# Altium PCB PCB.PcbDoc
Units mil, origin at the board's own origin, x right, y up, seen from the top; angles counter-clockwise.
Board outline 920 x 875 mil, 6 copper layers (Top Layer, Mid Layer 1, Mid Layer 2, Mid Layer 3, Mid Layer 4, Bottom Layer), stack 47.126 mil thick; 39 components, 39 nets, 267 pads, 117 vias.
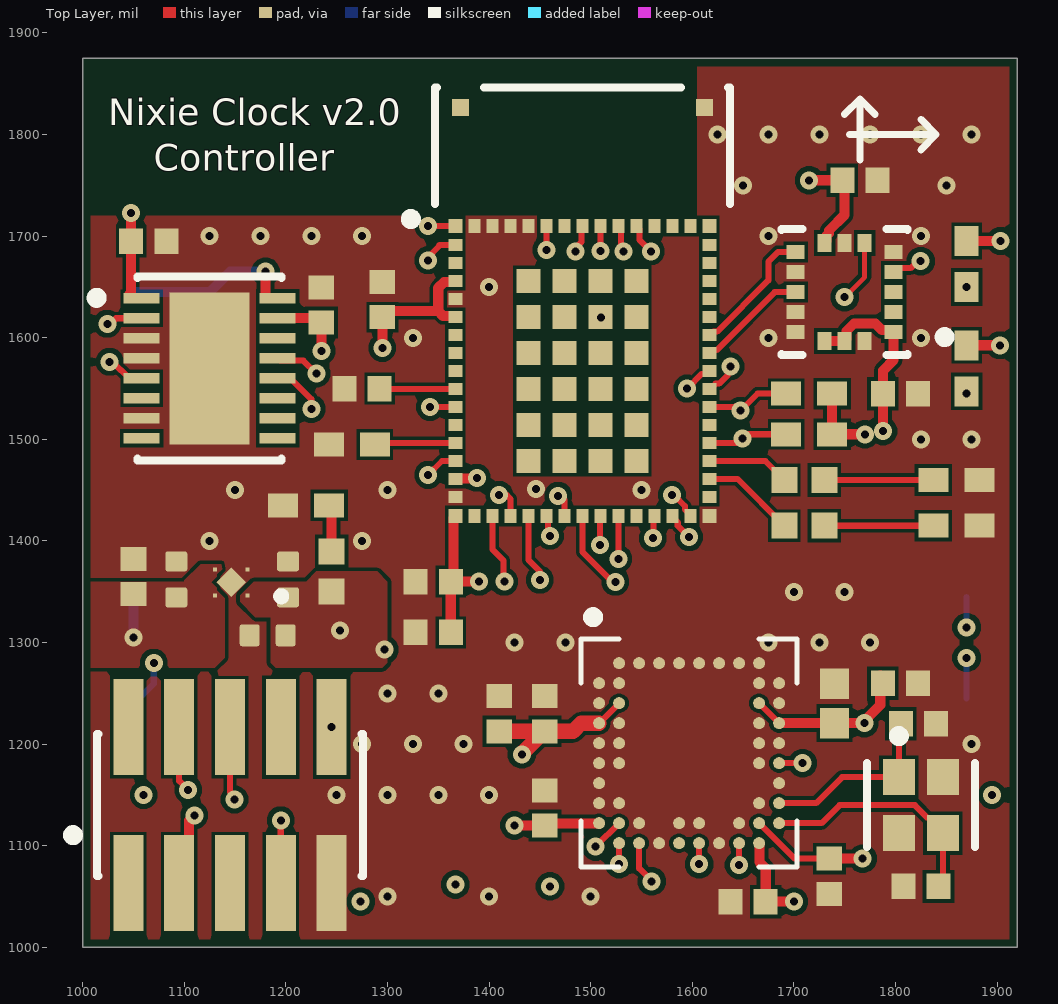
[diagram p0: Top Layer view]
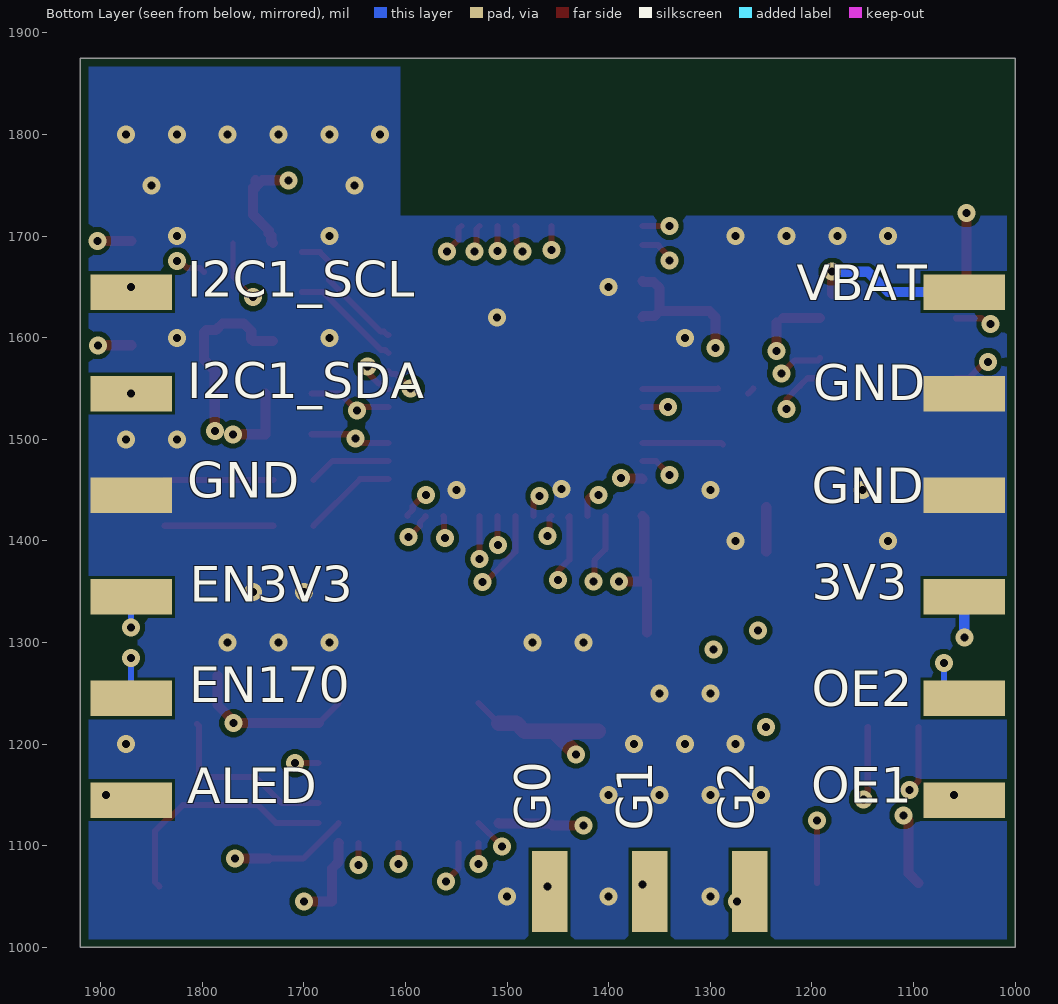
[diagram p1: Bottom Layer view, seen from below]
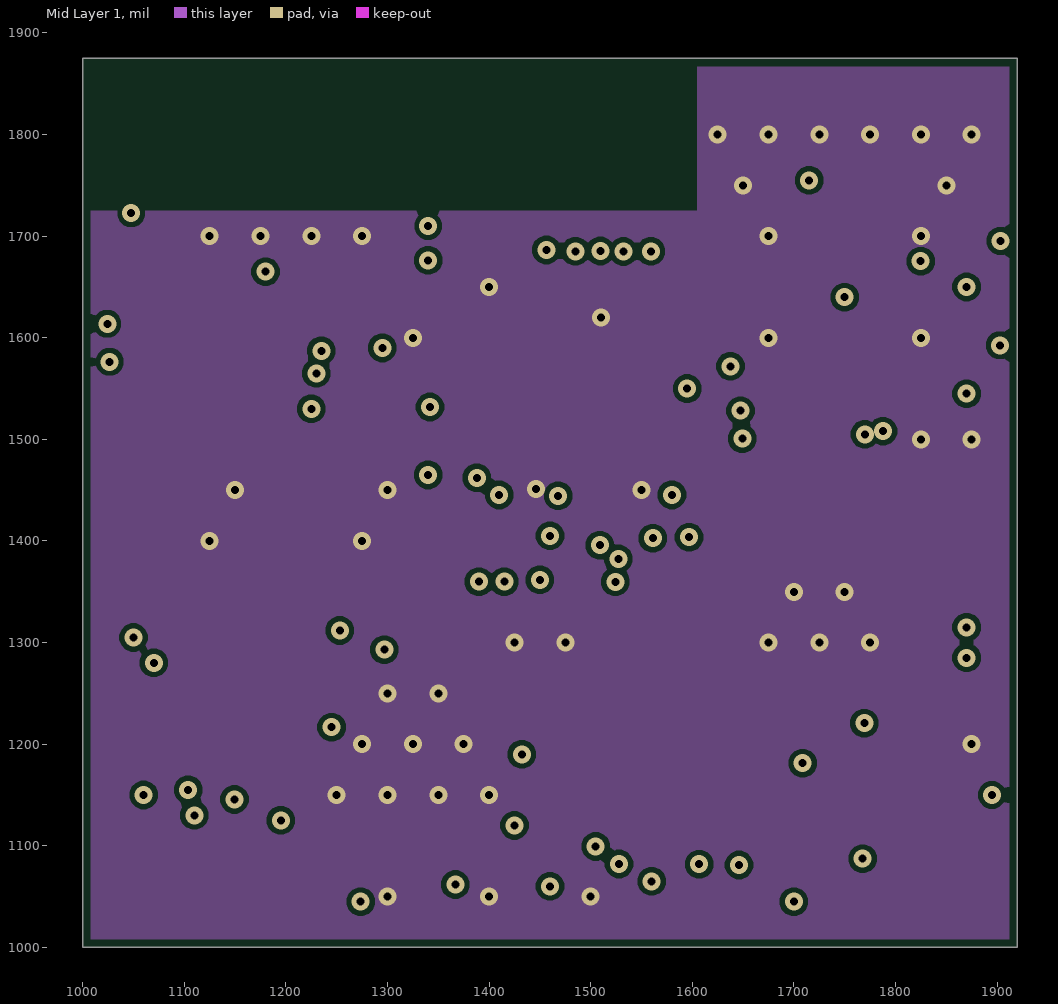
[diagram p2: Mid Layer 1]
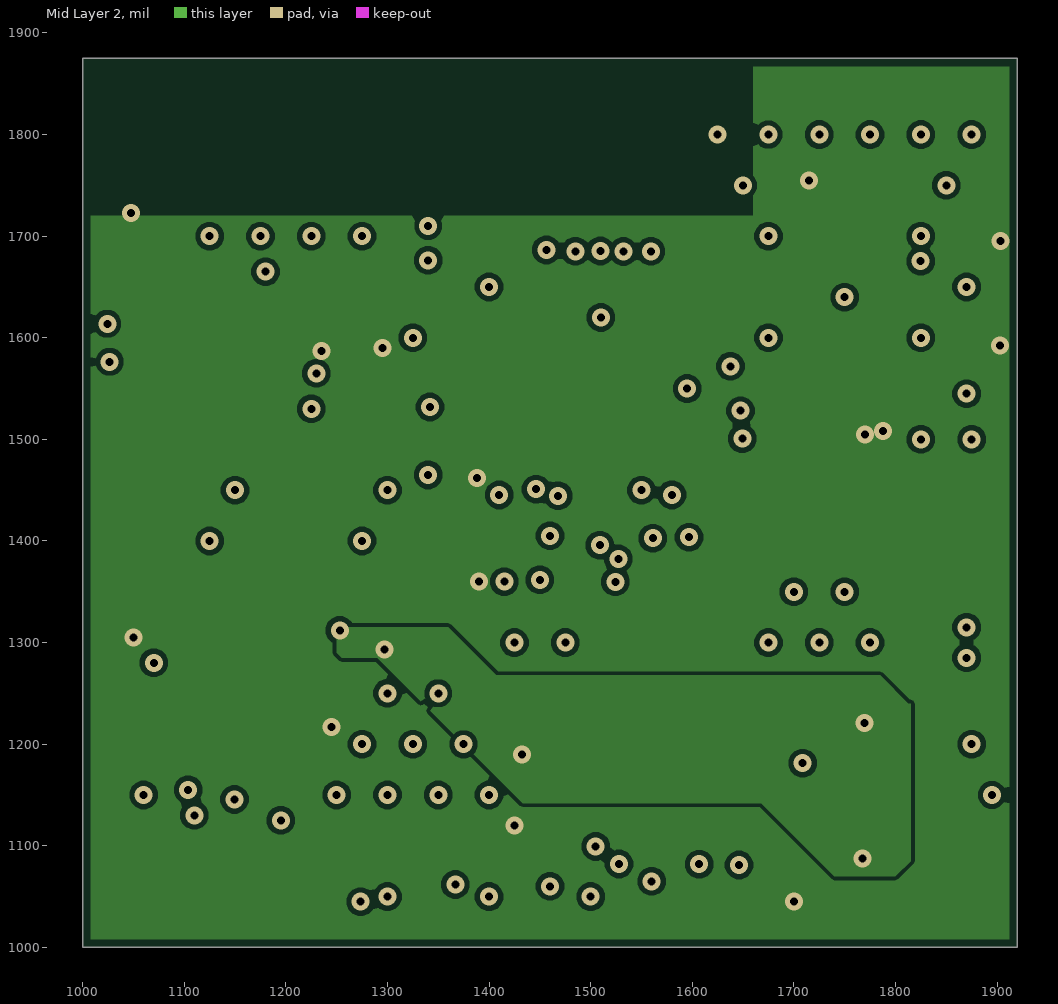
[diagram p3: Mid Layer 2]
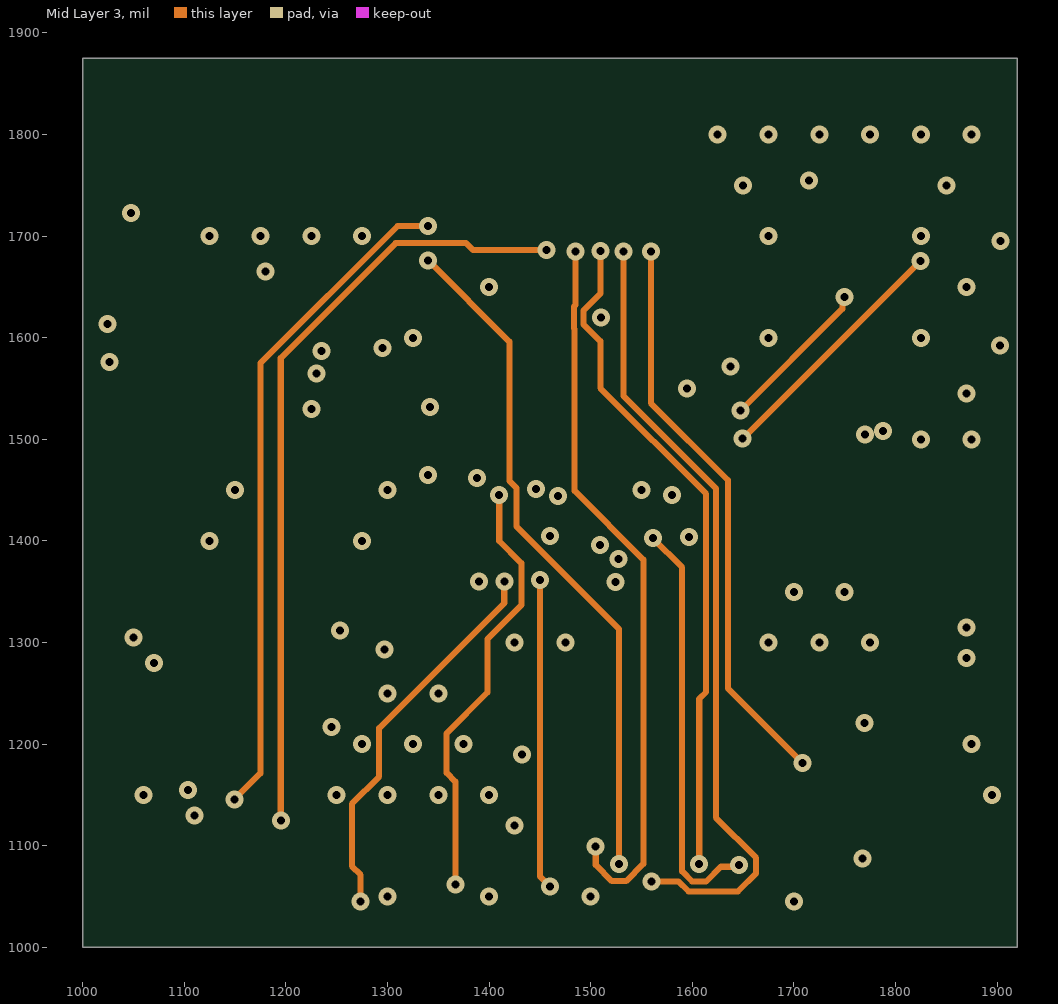
[diagram p4: Mid Layer 3]
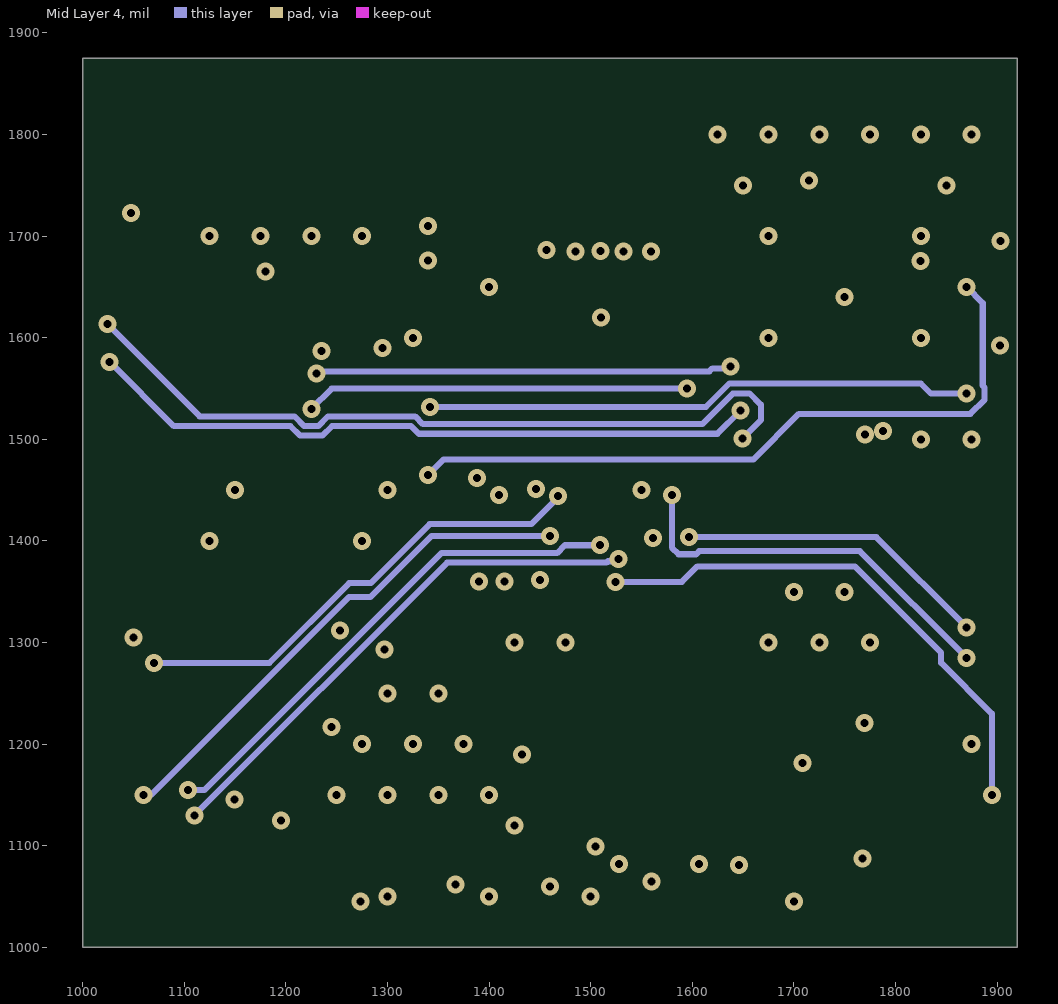
[diagram p5: Mid Layer 4]

## Layer stack, top to bottom
Top Solder: solder mask 0.5, Solder Resist, Dk 3.8
Top Layer: signal copper 1.378
Dielectric 1: prepreg 3.937, 2313, Dk 4.05
Mid Layer 1: signal copper 0.689
Core 1: core 14.3701, FR-4, Dk 4.5
Mid Layer 2: signal copper 0.689
Dielectric 2: prepreg 5, 2116, Dk 4.25
Mid Layer 3: signal copper 0.689
Core 2: core 14.3701, FR-4, Dk 4.5
Mid Layer 4: signal copper 0.689
Dielectric 3: prepreg 3.937, 2313, Dk 4.05
Bottom Layer: signal copper 1.378
Bottom Solder: solder mask 0.5, Solder Resist, Dk 3.8

## Board outline
1000,1000 1920,1000 1920,1875 1000,1875

## Design rules (kind name [scope] priority, off if disabled: settings)
BoardOutlineClearance [All] p1: gap=7.87 ignorepadtopadclearanceinfootprint=FALSE
Clearance [All] p1: gap=3.5 ignorepadtopadclearanceinfootprint=FALSE except(5: Arc-Via Track-Via SMDPad-Via THPad-Via Via-Via Via-Fill Via-Poly Via-Region Via-Text; 9.84: Arc-Hole Track-Hole SMDPad-Hole THPad-Hole Via-Hole Fill-Hole Poly-Hole Region-Hole Text-Hole)
ComponentClearance [All] p1: gap=3.5 collisioncheckmode=3 verticalgap=3.5 showdistances=TRUE
DiffPairsRouting [All] p1: maxlimit=3.5 minlimit=3.5 mostfreqgap=3.5 toplayer_minwidth=3.5 toplayer_maxwidth=71497.94 toplayer_prefwidth=3.5 midlayer1_minwidth=3.5 midlayer1_maxwidth=71497.94 midlayer1_prefwidth=3.5 midlayer2_minwidth=3.5 midlayer2_maxwidth=71497.94 midlayer2_prefwidth=3.5 midlayer3_minwidth=3.5 midlayer3_maxwidth=71497.94 midlayer3_prefwidth=3.5 midlayer4_minwidth=3.5 midlayer4_maxwidth=71497.94 midlayer4_prefwidth=3.5 bottomlayer_minwidth=3.5 bottomlayer_maxwidth=71497.94 bottomlayer_prefwidth=3.5 maxuncoupledlength=500
Height [All] p1: minheight=0 maxheight=71497.94 prefheight=500
HoleSize [All] p1: absolutevalues=TRUE maxlimit=248.03 minlimit=7.87 maxpercent=80.000 minpercent=20.000
HoleToHoleClearance [All] p1: gap=9.84 allowstackedmicrovias=FALSE
MinimumAnnularRing [All] p1: minimumring=3
MinimumSolderMaskSliver [All] p1: minsoldermaskwidth=0
PlaneClearance [All] p1: clearance=3.5
PlaneConnect PlaneConnectPowerPads [InPadClass('PowerPads')] p1: planeconnectstyle=Direct reliefexpansion=20 reliefentries=4 reliefconductorwidth=10 reliefairgap=10
PlaneConnect [All] p2: planeconnectstyle=Direct reliefexpansion=11.81 reliefentries=4 reliefconductorwidth=3.5 reliefairgap=3.5
PolygonConnect PolygonConnectPowerPads [All vs (InPadClass('PowerPads'))] p1: connectstyle=Direct reliefconductorwidth=10 reliefentries=4 polygonreliefangle="90 Angle" airgapwidth=10
PolygonConnect [All] p2: connectstyle=Direct reliefconductorwidth=3.5 reliefentries=4 polygonreliefangle="90 Angle" airgapwidth=3.5
RoutingVias [All] p1: holewidth=7.87 width=17.72 viastyle="Through Hole" minholewidth=7.87 minwidth=17.72 maxholewidth=248.03 maxwidth=257.87
SilkToSilkClearance [All] p1: silktosilkclearance=0
SilkToSolderMaskClearance [IsPad] p1: minsilkscreentomaskgap=3.5 clearancetoexposedcopper=TRUE
SolderMaskExpansion SolderMaskExpansion_Via [IsVia] p1: expansion=2.95 istentingtop=TRUE
SolderMaskExpansion [All] p2: expansion=2.95 istentingtop=FALSE
Width [All] p1: maxlimit=71497.94 minlimit=3.5 preferedwidth=3.5
20 further rules are at their usual default settings.

## Classes and differential pairs
component class Peripherals: C21 U4
component class Radar: C10 U1 U2 Y1
component class Processor: D2 MD1 R3 R8

## Components (designator, comment, footprint, x,y, rotation, side; value= is the part's Value field where it differs from the comment)
C1 "" "CAP 0402_1005" 1275,1550 r180 top value="0.1 µF"
C2 "" "CAP 0402_1005" 1050,1365 r270 top value="0.1 µF"
C3 "" "CAP 0402_1005" 1345,1310 r0 top value="1 µF"
C4 "" "CAP 0402_1005" 1295,1637.68 r270 top value="0.1 µF"
C5 "" "CAP 0402_1005" 1345,1360 r0 top value="1 µF"
C6 "" "CAP 0402_1005" 1455,1137.32 r270 top value="0.1 µF"
C7 "" "CAP 0402_1005" 1825,1060 r0 top value="9 pF"
C8 "" "CAP 0402_1005" 1822.68,1220 r180 top value="9 pF"
C9 "" "CAP 0402_1005" 1805,1260 r180 top value="0.1 µF"
C10 "" "CAP 0402_1005" 1410,1230 r270 top value="0.1 µF"
C11 "" "CAP 0402_1005" 1735,1070 r90 top value="0.1 µF"
C12 "" "CAP 0402_1005" 1455,1230 r270 top value="1 µF"
C13 "" "CAP 0402_1005" 1805,1545 r180 top value="0.1 µF"
C14 "" "CAP 0402_1005" 1235,1632.32 r270 top value="1 µF"
C15 "" CAPC1050X55X23ML05T13 1740,1240 r270 top
C16 "" "CAP 0402_1005" 1655,1045 r0 top value="1 µF"
C17 "" CAPC0402(1005)60_L 1182.17,1307.17 r0 top value=10u
C18 "" CAPC0402(1005)60_L 1202.17,1362.17 r270 top value=100n
C19 "" CAPC0402(1005)60_L 1092.17,1362.17 r270 top value=10u
C20 "" "CAP 0402_1005" 1765,1755 r180 top value="0.1 µF"
C21 "" "CAP 0402_1005" 1065,1695 r180 top value="1 µF"
D1 "" "LED 0402_1005 YELLOW" 1860,1415 r0 top value=Red
D2 "" "LED 0402_1005 YELLOW" 1860,1460 r0 top value=Red
D3 "" "LED 0402_1005 YELLOW" 1220,1435 r180 top value=Red
J1 "" FP-62131021021-MFG 1145,1140 r0 top
MD1 "" FP-STM32WB5MMGH6TR-MFG 1491.85,1628.31 r0 top
R1 "" "RES 0402_1005" 1265,1495 r0 top value="10 kOhms"
R2 "" RESC1005X40X25ML05T05 1710.32,1415 r180 top value=1.5k
R3 "" RESC1005X40X25ML05T05 1710.32,1460 r180 top value=1.5k
R4 "" RESC1005X40X25ML05T05 1245,1370 r270 top value=1.5k
R5 "" "RES 0402_1005" 1870,1672.64 r270 top value="10 kOhms"
R6 "" "RES 0402_1005" 1870,1570 r270 top value="10 kOhms"
R7 "" "RES 0402_1005" 1715,1505 r180 top value="10 kOhms"
R8 "" "RES 0402_1005" 1715,1545 r180 top value="10 kOhms"
U1 "" BGA50C50P10X10_520X550X90 1596.85,1191.18 r0 top
U2 "" VREG_NCP170AMX180TBG 1146.22,1359.37 r180 top
U4 "" FP-SOT1992-1_DD-MFG 1125,1570 r0 top
U5 "" FP-TFLGA16-7983231-MFG 1750,1645 r180 top
Y1 "" FP-CX2016DB48000C0WPLA2-MFG 1825,1140 r270 top

## Footprints (in the part's own frame and the unit in brackets; to place one, negate y for a bottom-side part, rotate by r counter-clockwise, add the part's x,y. Pads: shape width x height; smd on the part's side, far side on the other; paste and mask are expansions set on the pad)
BGA50C50P10X10_520X550X90 [mm]
  round 0.3 smd mask+0.05: A2(-1.75,2.25) A3(-1.25,2.25) A4(-0.75,2.25) A5(-0.25,2.25) A6(0.25,2.25) A7(0.75,2.25) A8(1.25,2.25) A9(1.75,2.25) B1(-2.25,1.75) B2(-1.75,1.75) B9(1.75,1.75) B10(2.25,1.75) C1(-2.25,1.25) C2(-1.75,1.25) C9(1.75,1.25) C10(2.25,1.25) D1(-2.25,0.75) D2(-1.75,0.75) D9(1.75,0.75) D10(2.25,0.75) E1(-2.25,0.25) E2(-1.75,0.25) E9(1.75,0.25) E10(2.25,0.25) F1(-2.25,-0.25) F2(-1.75,-0.25) F9(1.75,-0.25) F10(2.25,-0.25) G1(-2.25,-0.75) G10(2.25,-0.75) H1(-2.25,-1.25) H2(-1.75,-1.25) H9(1.75,-1.25) H10(2.25,-1.25) J1(-2.25,-1.75) J2(-1.75,-1.75) J3(-1.25,-1.75) J5(-0.25,-1.75) J6(0.25,-1.75) J8(1.25,-1.75) J9(1.75,-1.75) J10(2.25,-1.75) K2(-1.75,-2.25) K3(-1.25,-2.25) K4(-0.75,-2.25) K5(-0.25,-2.25) K6(0.25,-2.25) K7(0.75,-2.25) K8(1.25,-2.25) K9(1.75,-2.25)
  silkscreen extent -2.7,-2.85 2.7,3.52, body extent -2.6,-3 2.6,2.5, height 0.51
"CAP 0402_1005" [mm] "Chip Capacitor, 2-Leads, Body 1.02x0.51mm, IPC Medium Density"
  rect 0.6x0.64 smd: 1(-0.44,0) 2(0.44,0)
  body extent -0.5,-0.26 0.5,0.26, height 0.52
CAPC0402(1005)60_L [mm] "Chip Capacitor, Body 1.0x0.5mm, Height 0.6mm, IPC High Density"
  rrect25% 0.5x0.55 smd: 1(-0.45,0) 2(0.45,0)
  body extent -0.5,-0.25 0.5,0.25, height 0.6
CAPC1050X55X23ML05T13 [mm] "Chip Capacitor, 2-Leads, Body 1.05x0.55mm, IPC Low Density"
  rect 0.76x0.72 smd: 1(-0.49,0) 2(0.49,0)
  body extent -0.53,-0.28 0.53,0.27, height 0.55
FP-62131021021-MFG [mm]
  rect 0.75x2.4 smd paste+0 mask+0: 1(-2.54,-1.95) 2(-2.54,1.95) 3(-1.27,-1.95) 4(-1.27,1.95) 5(0,-1.95) 6(0,1.95) 7(1.27,-1.95) 8(1.27,1.95) 9(2.54,-1.95) 10(2.54,1.95)
  silkscreen extent -4.05,-1.78 3.32,1.78, body extent -3.42,-3.25 3.42,3.25, height 0.25
FP-CX2016DB48000C0WPLA2-MFG [mm]
  rect 0.9x0.8 smd paste+0 mask+0: 1(-0.7,-0.55) 2(0.7,-0.55) 3(0.7,0.55) 4(-0.7,0.55)
  silkscreen extent -1.85,-1.35 1.05,1.35, body extent -1.25,-1.05 1.25,1.05, height 0.25
FP-SOT1992-1_DD-MFG [mm]
  rect 0.9x0.27 smd paste+0 mask+0: 1(-1.7,1.75) 2(-1.7,1.25) 3(-1.7,0.75) 4(-1.7,0.25) 5(-1.7,-0.25) 6(-1.7,-0.75) 7(-1.7,-1.25) 8(-1.7,-1.75) 9(1.7,-1.75) 10(1.7,-1.25) 11(1.7,-0.75) 12(1.7,-0.25) 13(1.7,0.25) 14(1.7,0.75) 15(1.7,1.25) 16(1.7,1.75)
  rect 2x3.8 smd paste-1000 mask+0: 17(0,0)
  silkscreen extent -2.95,-2.3 1.8,2.3, body extent -2.25,-2.4 2.25,2.4, height 0.25
FP-STM32WB5MMGH6TR-MFG [mm]
  rect 0.35x0.35 smd paste+0 mask+0: 1(-3.175,2.075) 17(-3.175,-5.175) 31(3.175,-5.175) 47(3.175,2.075)
  rect 0.35x0.3 smd paste+0 mask+0: 2(-3.175,1.6) 3(-3.175,1.15) 4(-3.175,0.7) 5(-3.175,0.25) 6(-3.175,-0.2) 7(-3.175,-0.65) 8(-3.175,-1.1) 9(-3.175,-1.55) 10(-3.175,-2) 11(-3.175,-2.45) 12(-3.175,-2.9) 13(-3.175,-3.35) 14(-3.175,-3.8) 15(-3.175,-4.25) 16(-3.175,-4.7) 32(3.175,-4.7) 33(3.175,-4.25) 34(3.175,-3.8) 35(3.175,-3.35) 36(3.175,-2.9) 37(3.175,-2.45) 38(3.175,-2) 39(3.175,-1.55) 40(3.175,-1.1) 41(3.175,-0.65) 42(3.175,-0.2) 43(3.175,0.25) 44(3.175,0.7) 45(3.175,1.15) 46(3.175,1.6)
  rect 0.3x0.35 smd paste+0 mask+0: 18(-2.7,-5.175) 19(-2.25,-5.175) 20(-1.8,-5.175) 21(-1.35,-5.175) 22(-0.9,-5.175) 23(-0.45,-5.175) 24(0,-5.175) 25(0.45,-5.175) 26(0.9,-5.175) 27(1.35,-5.175) 28(1.8,-5.175) 29(2.25,-5.175) 30(2.7,-5.175) 48(2.7,2.075) 49(2.25,2.075) 50(1.8,2.075) 51(1.35,2.075) 52(0.9,2.075) 53(0.45,2.075) 54(0,2.075) 55(-0.45,2.075) 56(-0.9,2.075) 57(-1.35,2.075) 58(-1.8,2.075) 59(-2.25,2.075) 60(-2.7,2.075)
  rect 0.6x0.6 smd paste+0 mask+0: 61(-1.35,0.7) 62(-1.35,-0.2) 63(-1.35,-1.1) 64(-1.35,-2) 65(-1.35,-2.9) 66(-1.35,-3.8) 67(-0.45,-3.8) 68(0.45,-3.8) 69(1.35,-3.8) 70(1.35,-2.9) 71(1.35,-2) 72(1.35,-1.1) 73(1.35,-0.2) 74(1.35,0.7) 75(0.45,0.7) 76(-0.45,0.7) 77(-0.45,-0.2) 78(-0.45,-1.1) 79(-0.45,-2) 80(-0.45,-2.9) 81(0.45,-2.9) 82(0.45,-2) 83(0.45,-1.1) 84(0.45,-0.2)
  rect 0.43x0.43 smd paste+0 mask+0: 85(-3.05,5.035) 86(3.05,5.035)
  silkscreen extent -4.41,2.13 3.69,5.54, body extent -4.19,-6.04 4.19,6.04, height 0.25
FP-TFLGA16-7983231-MFG [mm]
  rect 0.45x0.35 smd paste+0 mask+0: 1(-1.225,1) 2(-1.225,0.5) 3(-1.225,0) 4(-1.225,-0.5) 5(-1.225,-1) 9(1.225,-1) 10(1.225,-0.5) 11(1.225,0) 12(1.225,0.5) 13(1.225,1)
  rect 0.35x0.45 smd paste+0 mask+0: 6(-0.5,-1.225) 7(0,-1.225) 8(0.5,-1.225) 14(0.5,1.225) 15(0,1.225) 16(-0.5,1.225)
  silkscreen extent -2.63,-1.58 1.58,1.58, body extent -2.07,-2.07 2.07,2.07, height 0.25
"LED 0402_1005 YELLOW" [mm] "Chip Diode, 2-Leads, Body 1.00x0.50mm, IPC Medium Density"
  rect 0.75x0.6 smd: 1(-0.575,0) 2(0.575,0)
  body extent -0.5,-0.25 0.5,0.25, height 0.21
"RES 0402_1005" [mm] "Chip Resistor, 2-Leads, Body 1.0x0.5mm, IPC Medium Density"
  rect 0.75x0.6 smd: 1(-0.575,0) 2(0.575,0)
  body extent -0.5,-0.25 0.5,0.25, height 0.35
RESC1005X40X25ML05T05 [mm] "Chip Resistor, 2-Leads, Body 1.05x0.55mm, IPC Low Density"
  rect 0.65x0.65 smd: 1(-0.5,0) 2(0.5,0)
  body extent -0.53,-0.28 0.53,0.28, height 0.4
VREG_NCP170AMX180TBG [mm]
  rect 0.1x0.1 smd paste-1 mask+0: 1(-0.405,0.325) 2(-0.405,-0.325) 3(0.405,-0.325) 4(0.405,0.325)
  rect 0.52x0.52 smd rot 45: 5(0,0)
  silkscreen extent -1.35,0.25 -1.15,0.45

## Part data
C1 C2 C4 C6 C9 C10 C11 C13 C20: library part C0402C104K7PAC7867, "CAP CER 0.1UF 4V X5R 0402", Capacitance="0.1 µF", Device Package="0402 (1005 Metric)", Manufacturer=KEMET, Operating Temperature="-55°C ~ 85°C", Supplier Part Number 1=399-14871-1-ND, Temperature Coefficient=X5R, Tolerance=±10%, Voltage - Rated=4V, Applications="Bypass, Decoupling", componentlink1description=Datasheet, componentlink1url=https://api.kemet.com/component-edge/download/datasheet/C0402C104K7PAC7867.pdf, ComponentLink2Description="DigiKey Link", ComponentLink2URL=https://www.digikey.com/en/products/detail/kemet/C0402C104K7PAC7867/7381987, Lifecycle Status=Active, Minimum Order=1, Mounting Type="Surface Mount, MLCC", Package / Case="0402 (1005 Metric)", packaging=TapeAndReel, Part Number=C0402C104K7PAC7867, Part Status=Active, partid=5603, price=0.01, series="SMD Comm X5R", Size / Dimension="0.039\" L x 0.020\" W (1.00mm x 0.50mm)", Supplier 1=DigiKey, Thickness (Max)="0.022\" (0.55mm)"
  C1: lastupdated="1/9/2022 12:30:40 pm"
  C2 C4 C6 C9 C10 C11 C13 C20: lastupdated="11/9/2022 9:36:31 am"
C3 C5 C12 C14 C16 C21: library part LMK105C6105KV-F, "CAP CER 1UF 10V X6S 0402", Capacitance="1 µF", Device Package="0402 (1005 Metric)", Manufacturer="Taiyo Yuden", Operating Temperature="-55°C ~ 105°C", Supplier Part Number 1=587-3409-1-ND, Temperature Coefficient=X6S, Tolerance=±10%, Voltage - Rated=10V, Applications="SMPS Filtering", componentlink1description=Datasheet, componentlink1url=https://www.yuden.co.jp/productdata/catalog/mlcc01_e.pdf, ComponentLink2Description="DigiKey Link", ComponentLink2URL=https://www.digikey.com/en/products/detail/taiyo-yuden/LMK105C6105KV-F/4157226, lastupdated="11/9/2022 9:36:40 am", Lifecycle Status=Active, Minimum Order=1, Mounting Type="Surface Mount, MLCC", Package / Case="0402 (1005 Metric)", packaging=TapeAndReel, Part Number=LMK105C6105KV-F, Part Status=Active, partid=2215, price=0.01, series=M, Size / Dimension="0.039\" L x 0.020\" W (1.00mm x 0.50mm)", Supplier 1=DigiKey, Thickness (Max)="0.022\" (0.55mm)"
C7 C8: library part CGA2B2C0G1H090D050BA, "CAP CER 9PF 50V C0G 0402", Capacitance="9 pF", Device Package="0402 (1005 Metric)", Manufacturer="TDK Corporation", Operating Temperature="-55°C ~ 125°C", Ratings=AEC-Q200, Supplier Part Number 1=445-5583-1-ND, Temperature Coefficient="C0G, NP0", Tolerance=±0.5pF, Voltage - Rated=50V, Applications=Automotive, componentlink1description=Datasheet, componentlink1url=https://product.tdk.com/info/en/catalog/datasheets/mlcc_automotive_general_en.pdf?ref_disty=digikey, ComponentLink2Description="DigiKey Link", ComponentLink2URL=https://www.digikey.com/en/products/detail/tdk-corporation/CGA2B2C0G1H090D050BA/2443061, lastupdated="14/9/2022 7:45:59 am", Lifecycle Status=Active, Minimum Order=1, Mounting Type="Surface Mount, MLCC", Package / Case="0402 (1005 Metric)", packaging=TapeAndReel, Part Number=CGA2B2C0G1H090D050BA, Part Status=Active, partid=7122, price=0.01, series=CGA, Size / Dimension="0.039\" L x 0.020\" W (1.00mm x 0.50mm)", Supplier 1=DigiKey, Thickness (Max)="0.022\" (0.55mm)"
C15: library part CMP-2000-05439-1, "Chip Capacitor, 100 nF, +/- 10%, 16 V, -55 to 125 degC, 0402 (1005 Metric), RoHS, Tape and Reel", Capacitance=100000pF, Case Size/Dimension=0402, Dielectric=X7R, Manufacturer="Samsung Electro-Mechanics", Rated Voltage=16V, Tolerance (%)=±10%, Datasheet URL=https://datasheet.ciiva.com/29198/458718-da-01-en-vs-kondensator-0402-29198423.pdf, Datasheet Version=Nov-10, Manufacturer URL=http://www.samsungsem.com/global/index.jsp
C17 C19: library part CMP-001-00074-3, "Chip Capacitor, 10µF +/-40%, 6.3V, 0402, Thickness 0.6 mm", Case/Package=0402, Max Operating Temperature=85°C, Min Operating Temperature=-55°C, Tolerance=10%, Voltage Rating=6.3V, Mounting Technology=SMT, Pins=2
C18: library part CMP-001-00074-3, "Chip Capacitor, 0.1µF +/-40%, 6.3V, 0402, Thickness 0.6 mm", Case/Package=0402, Max Operating Temperature=85°C, Min Operating Temperature=-55°C, Tolerance=10%, Voltage Rating=6.3V, Mounting Technology=SMT, Pins=2
D1 D2 D3: library part BL-HKC37A-AV-TRB, "0402 RED", Color=Yellow, Current - Test=20mA, Device Package="0402 (1005 Metric)", Lens Color=Colorless, Manufacturer="American Bright Optoelectronics Corporation", Millicandela Rating=120mcd, Supplier Device Package=0402, Supplier Part Number 1=BL-HKC37A-AV-TRBCT-ND, Voltage - Forward (Vf) (Typ)=2.2V, componentlink1description=Datasheet, componentlink1url=https://americanbrightled.com/pdffiles/smt/BL-HKC37A-AV-TRB.pdf, ComponentLink2Description="DigiKey Link", ComponentLink2URL=https://www.digikey.com/en/products/detail/american-bright-optoelectronics-corporation/BL-HKC37A-AV-TRB/9678171, Configuration=Standard, Height (Max)=0.45mm, lastupdated="11/9/2022 10:29:51 am", Lens Style="Rectangle with Flat Top", Lens Transparency=Clear, Lifecycle Status=Active, Minimum Order=1, Mounting Type="Surface Mount", Package / Case="0402 (1005 Metric)", packaging=TapeAndReel, Part Number=BL-HKC37A-AV-TRB, Part Status=Active, partid=1041, price=0.06, series=-, Size / Dimension="1.00mm L x 0.50mm W", Supplier 1=DigiKey, Viewing Angle=120°, Wavelength - Dominant=589nm, Wavelength - Peak=590nm
J1: library part CMP-1502-00938-2, "1.27mm SMT Straight Dual Pin Header WR-PHD", RoHS Compliant=Yes
MD1: library part CMP-12160-000017-1, "ULTRA-LOW-POWER DUAL CORE ARM CO"
R1 R5 R6 R7 R8: library part RP73PF1E10KBTD, "RES 10K OHM 0.1% 1/10W 0402", Device Package="0402 (1005 Metric)", Manufacturer="TE Connectivity Passive Product", Operating Temperature="-55°C ~ 155°C", Power (Watts)="0.1W, 1/10W", Resistance="10 kOhms", Supplier Device Package=0402, Supplier Part Number 1=A127415CT-ND, Temperature Coefficient=±25ppm/°C, Tolerance=±0.1%, componentlink1description=Datasheet, componentlink1url=https://www.te.com/commerce/DocumentDelivery/DDEController?Action=srchrtrv&DocNm=1773272&DocType=DS&DocLang=English, ComponentLink2Description="DigiKey Link", ComponentLink2URL=https://www.digikey.com/en/products/detail/te-connectivity-passive-product/RP73PF1E10KBTD/8260957, Composition="Thin Film", Height - Seated (Max)="0.014\" (0.35mm)", lastupdated="1/9/2022 12:46:57 pm", Lifecycle Status=Active, Minimum Order=1, Number of Terminations=2, Package / Case="0402 (1005 Metric)", packaging=TapeAndReel, Part Number=RP73PF1E10KBTD, Part Status=Active, partid=2434, price=0.09, series="RP73, Holsworthy", Size / Dimension="0.039\" L x 0.020\" W (1.00mm x 0.50mm)", Supplier 1=DigiKey
R2 R3 R4: library part CMP-009-00019-5, "Chip Resistor, 1.5 KOhm, +/- 1%, 63 mW, -55 to 155 degC, 0402 (1005 Metric)", Case/Package=0402, Max Operating Temperature=155°C, Min Operating Temperature=-55°C, Power=63mW, Tolerance=1%, Voltage Rating=50V, Mounting Technology=SM, Pins=2, RoHS Compliant=True
U1: library part CMP-349-000000-1, "Acconeer A121 pulsed coherent 60 GHz radar sensor", Case/Package=BGA, Manufacturer="Acconeer AB", Max Operating Tempereture=85, Min Operating Temperature=-40°C, Package=fcCSP50, Package Size="5.2 x 5.5 x 0.88 mm", Design Item ID=CMP-010-00030-6, Mounting Type=SMD, RoHS Compliant=Yes, Source=A121-001-T&R.SchLib
U2: library part CMP-031-00006-1, "Linear Voltage Regulator IC 1 Output 150mA 4-XDFN (1x1)", Case/Package=None, Availability=Unavailable, Component Type=Standard, Design Item ID=NCP170AMX180TBG, MP=NCP170AMX180TBG, Pins=5, price=None, Source=NCP170AMX180TBG.SchLib
U4: library part CMP-10083-000021-1, "IC RTC W/XTAL AUTO HLSON16"
U5: library part CMP-12175-000002-1, "ACCEL 100-400G I2C/SPI 16TFLGA", Manufacturer=STMicroelectronics, Manufacturer Part Number=H3LIS331DLTR, Max Supply Voltage=3.6V, Min Supply Voltage=2.16V, Operating Supply Current=10-300uA, Package=TFLGA16-7983231, Temperature="-40°C to +85°C", Temperature Range High=+85°C, Temperature Range Low=-40°C, Accel Axis="X+Y and Z", Accel Range=100/200/400g, Accel Resolution=16bits, Automotive=No, Category=IC, ComponentLink2Description=Datasheet, ComponentLink2URL=https://www.st.com/resource/en/datasheet/h3lis331dl.pdf, Device Class L1=Sensors, Device Class L2="Motion Sensors", Device Class L3=Accelerometers, Digikey Description="ACCEL 100-400G I2C/SPI 16TFLGA", Footprint Url=https://www.st.com/content/ccc/resource/technical/document/technical_note/73/17/9c/16/dd/96/4a/01/CD00134799.pdf/files/CD00134799.pdf/jcr:content/translations/en.CD00134799.pdf, Height=1mm, Lead Free=Yes, Mouser Description="Accelerometer Triple +/-100g/+/-200g/+/-400g 2.5V 16-Pin TFLGA T/R", Octopart=https://octopart.com/h3lis331dltr-stmicroelectronics-29186499, RoHS=TRUE, Sensor Output=I2C,SPI
Y1: library part CMP-20727-000003-1, "CRYSTAL 48.0000MHZ 7PF SMD", Frequency=48000kHz, Load Capacitance=7pF, Manufacturer=Kyocera, Manufacturer Part Number=CX2016DB48000C0WPLA2, Package=0, Temperature="-40°C to +85°C", Temperature Range High=+85°C, Temperature Range Low=-40°C, Tolerance=20ppm, Automotive=No, Category=Crys, ComponentLink2Description=Datasheet, ComponentLink2URL=https://global.kyocera.com/prdct/electro/product/pdf/cx2016db_e.pdf, Device Class L1="Passive Components", Device Class L2="Crystals / Oscillators", Device Class L3=Crystals, Digikey Description="CRYSTAL 48.0000MHZ 7PF SMD", Esr=22Ω, Height=0.45mm, Lead Free=Yes, Mouser Description="Crystals 48MHz 7pF", Octopart=https://octopart.com/cx2016db48000c0wpla2-avx+%2F+kyocera-52876167, RoHS=TRUE, series=CX2016DB

## Free pads (board coordinates)
  rect 80x35 smd far side: 8(1050,1145) 8(1870,1145) 9(1050,1245) 9(1870,1245) 10(1050,1345) 10(1870,1345) 11(1050,1445) 11(1870,1445) 12(1050,1545) 12(1870,1545) 13(1050,1645) 13(1870,1645)
  rect 35x80 smd far side: 13(1261.3,1055) 14(1359.72,1055) 15(1458.15,1055)

## Via types
v1: diameter 17.72, hole 7.87, Top Layer to Bottom Layer, tented both sides, 117 vias

## Nets (pads, with @x,y where several pads share a name; then routed paths per layer and width w, separated by ;. In a path a pad name is that pad's centre, name@x,y a point inside that pad or via, vN(x,y) a via of type N, cw(c..) or ccw(c..) an arc to the next point about the centre after c; other vN are vias at no path point)
1V8: C9.2 C10.2 C11.2 C12.2 C15.2 C17.2 C18.2 R4.2 U1.C2 U1.C9 U1.D1 U1.D10 U1.J9 U2.1 | length 442.8
  Top Layer w6: U1.D1 U1.C2 ; U1.J9 1700.71,1087.32 C11.2 ; U1.C9 U1.D10
  Top Layer w10: U1.D10 C15.2 v1(1769.29,1220.71) 1769.29,1222.8 1785,1238.51 C9.2@1785,1267.68 ; C11.2 v1(1767.68,1087.32)
  Top Layer w15: C10.2 C12.2@1454.21,1212.68 ; v1(1432.32,1190) 1432.84,1190.52 1432.84,1191.31 C12.2@1454.21,1212.68 ; U1.D1 1490.71,1220.71 1482.68,1212.68 C12.2 C12.2@1454.21,1212.68
  other v1: 1296.92,1293.08 1253.08,1311.92
3V3: C2.2 C3.2 C4.2 C5.2 C6.2 C13.2 C14.2 C16.2 C19.2 C20.2 C21.2 J1.10 MD1.4 MD1.6 MD1.15 MD1.17 pad.10@1050,1345 R5.1 R6.1 R7.1 R8.1 U1.J1 U1.K9 U2.3 U2.4 U4.1 U4.15 U5.1 U5.8 U5.14 U5.15 | length 1102.8
  Top Layer w10: U4.1@1046.14,1643.11 1047.36,1643.11 1047.68,1643.43 C21.2 v1(1047.68,1722.68) ; U4.15@1192.34,1619.53 1208.2,1619.53 1208.3,1619.63 C14.2@1228.32,1619.63 ; v1(1235,1587.16) C14.2 ; v1(1295,1590) C4.2 1300.94,1626.29 1350,1626.29 ; C3.2 C5.2 ; MD1.17 1364.96,1422.68 1364.96,1362.64 C5.2 ; MD1.15 1367.45,1461.59 1387.33,1461.59 v1(1387.93,1462.19) ; MD1.6 1365.94,1621.34 1354.95,1621.34 1350,1626.29 ; MD1.4 1365.94,1654.96 1355.86,1654.96 1350,1649.1 1350,1626.29 ; v1(1390,1360) C5.2 ; v1(1425,1120) C6.2 1456.94,1121.94 1507.92,1121.94 U1.J1 ; U1.K9 1666.09,1102.25 1666.09,1083.91 1672.32,1077.68 C16.2 v1(1700,1045) ; v1(1715,1755) 1740.87,1755 C20.2@1747.68,1748.19 ; U5.14 U5.15 1751.89,1598.66 1751.89,1606.75 1759.27,1614.13 1780.1,1614.13 1786.71,1607.52 1796.34,1607.52 U5.1 1798.23,1578.23 1787.68,1567.68 C13.2 v1(1787.68,1508.14) ; U5.8 1732.2,1695.12 1732.2,1700.54 1734.61,1702.94 1734.61,1705.61 1750,1721 C20.2@1750,1747.68 ; R8.1 R7.1 v1(1770,1505) ; C20.2@1747.68,1747.68 C20.2 ; R6.1 v1(1902.79,1592.64) ; R5.1 v1(1903.27,1695.28) v1@1904.72,1695.28
  Bottom Layer w10: v1(1050,1305) pad.10@1050,1345
  other v1: 1245,1216.77
GND: C1.2 C2.1 C3.1 C4.1 C5.1 C6.1 C7.1 C8.1 C9.1 C10.1 C11.1 C12.1 C13.1 C14.1 C15.1 C16.1 C17.1 C18.1 C19.1 C20.1 C21.1 D1.2 D2.2 D3.2 J1.9 MD1.5 MD1.16 MD1.31 MD1.57 MD1.58 MD1.59 MD1.60 MD1.84 MD1.86 pad.11 pad.12@1050,1545 R1.1 U1.A2 U1.A3 U1.A4 U1.A5 U1.A6 U1.A7 U1.A8 U1.A9 U1.B1 U1.B2 U1.B9 U1.B10 U1.C1 U1.C10 U1.D2 U1.D9 U1.E1 U1.E2 U1.E9 U1.E10 U1.F1 U1.F2 U1.F9 U1.G1 U1.G10 U1.H1 U1.H2 U1.H9 U1.J3 U1.J5 U1.J6 U1.J8 U1.K4 U1.K7 U2.2 U2.5 U4.3 U4.4 U4.7 U4.17 U5.5 U5.7 U5.10 U5.12 U5.13 U5.16 Y1.2 Y1.4 | length 7.7
  Top Layer w6: C1.2 C1.2@1262.68,1545 ; MD1.84 v1(1510,1620)
  other v1: 1300,1050 1400,1050 1500,1050 1250,1150 1300,1150 1350,1150 1400,1150 1275,1200 1325,1200 1375,1200 1875,1200 1300,1250 1350,1250 1425,1300 1475,1300 1675,1300 1725,1300 1775,1300 1700,1350 1750,1350 1125,1400 1275,1400 1150,1450 1300,1450 1550,1450 1446.28,1451.02 1825,1500 1875,1500 1325,1600 1675,1600 1825,1600 1400,1650 1125,1700 1175,1700 1225,1700 1275,1700 1675,1700 1825,1700 1650,1750 1850,1750 1625,1800 1675,1800 1725,1800 1775,1800 1825,1800 1875,1800
I2C_1_SCL: MD1.14 pad.13@1870,1645 R5.2 | length 729.4
  Top Layer w6: v1(1340,1465) 1353.7,1478.7 MD1.14
  Mid Layer 4 w6: v1(1340,1465) 1355,1480 1660,1480 1705,1525 1873.84,1525 1887.79,1538.95 1887.79,1551.05 1885.93,1552.91 1885.93,1634.07 v1(1870,1650)
I2C_1_SDA: MD1.11 pad.12@1870,1545 R6.2 | length 569.2
  Top Layer w6: v1(1341.85,1531.85) MD1.11
  Top Layer w10: v1(1870,1545) R6.2
  Mid Layer 4 w6: v1(1341.85,1531.85) 1613.42,1531.85 1636.57,1555 1825,1555 1835,1545 v1(1870,1545)
I2C_3_SCL: MD1.35 R7.2 U4.2 U5.4 | length 1147.2
  Top Layer w6: v1@1021.36,1613.64 v1(1024.21,1613.64) 1027.38,1613.64 1032.95,1619.21 U4.2 ; MD1.35 1644.93,1496.42 v1(1649.22,1500.71) 1653.51,1505 R7.2 ; U5.4 1802.12,1668.57 1814.89,1668.57 1821.68,1675.37 v1(1824.85,1675.37)
  Mid Layer 3 w6: v1(1649.22,1500.71) 1649.71,1500.71 1824.36,1675.37 v1(1824.85,1675.37)
  Mid Layer 4 w6: v1(1024.21,1613.64) 1115.21,1522.64 1208.52,1522.64 1218.02,1513.14 1231.98,1513.14 1241.48,1522.64 1327.22,1522.64 1334.87,1514.99 1609.99,1514.99 1639.89,1544.89 1640.27,1544.89 1640.52,1545.14 1656.49,1545.14 1667.51,1534.11 1667.51,1519.01 v1(1649.22,1500.71)
I2C_3_SDA: MD1.37 R8.2 U4.5 U5.6 | length 1005
  Top Layer w5: v1(1750,1640) 1769.68,1659.68 U5.6
  Top Layer w6: v1@1026.36,1576.36 v1(1026.5,1576.36) 1029.33,1576.36 1037.66,1568.03 1037.8,1568.03 1045.67,1560.16 U4.5 ; MD1.37 v1@1641.85,1531.85 ; v1@1642.89,1532.89 v1(1647.51,1528.28) 1664.22,1545 R8.2
  Mid Layer 3 w6: v1(1647.51,1528.28) 1747.76,1628.54 1747.76,1637.76 v1(1750,1640)
  Mid Layer 4 w6: v1(1026.5,1576.36) 1089.71,1513.14 1204.58,1513.14 1214.08,1503.64 1235.92,1503.64 1245.42,1513.14 1323.28,1513.14 1330.93,1505.49 1624.71,1505.49 v1(1647.51,1528.28)
IO_ALED: MD1.24 pad.8@1870,1145 | length 606.1
  Top Layer w6: MD1.24 1491.85,1389.17 1521.26,1359.76 v1(1524.31,1359.76) v1@1527.48,1359.76
  Mid Layer 4 w6: v1(1524.31,1359.76) 1589.76,1359.76 1605,1375 1760,1375 1845,1290 1845,1280 1895,1230 v1(1895,1150)
IO_EN_3: MD1.29 pad.10@1870,1345 | length 367.5
  Top Layer w6: MD1.29 1580.43,1423.58 1585.74,1418.27 1585.74,1414.98 1596.86,1403.87 v1(1596.86,1403.82)
  Mid Layer 4 w6: v1(1596.86,1403.82) 1781.18,1403.82 v1(1870,1315)
  Bottom Layer w6: v1(1870,1315) pad.10@1870,1345
IO_EN_170: MD1.30 pad.9@1870,1245 | length 458.5
  Top Layer w6: v1(1580,1445.32) 1581.67,1445.32 1592.84,1434.15 1592.84,1430.86 1598.15,1425.55 MD1.30
  Mid Layer 4 w6: v1(1580,1445.32) 1580,1393.51 1586.55,1386.96 1603.84,1386.96 1606.88,1390 1765,1390 v1(1870,1285)
  Bottom Layer w6: pad.9@1870,1245 v1(1870,1285)
IO_G_0: MD1.21 pad.15 | length 375.2
  Top Layer w6: MD1.21@1440,1423.27 MD1.21 1438.7,1381.3 1450,1370 v1(1450,1361.78)
  Mid Layer 3 w6: v1(1450,1361.78) 1450,1070 v1(1460,1060)
IO_G_1: MD1.20 pad.14 | length 456.1
  Top Layer w6: v1(1410.02,1445.29) 1410.31,1445 1417.47,1445 1420.98,1441.49 MD1.20
  Mid Layer 3 w6: v1(1366.86,1061.86) 1366.86,1163.14 1358.14,1171.86 1358.14,1210.58 1398.43,1250.87 1398.43,1303.43 1431.86,1336.86 1431.86,1378.14 1410.02,1399.98 v1(1410.02,1445.29)
IO_G_2: MD1.19 pad.13@1261.3,1055 | length 451.5
  Top Layer w6: MD1.19 1403.27,1391.73 1414.14,1380.86 1414.14,1360.86 v1(1415,1360)
  Mid Layer 3 w6: v1@1273.62,1043.62 v1(1273.62,1045) 1273.62,1071.38 1265,1080 1265,1141.16 1291.86,1168.02 1291.86,1215.7 1415,1338.84 v1(1415,1360)
IO_OE_1: MD1.22 pad.8@1050,1145 | length 526.7
  Top Layer w6: MD1.22 1458.21,1422.78 1458.21,1406.79 v1(1460,1405)
  Mid Layer 4 w6: v1(1060,1150) 1067.32,1150 1262.32,1345 1283.43,1345 1343.43,1405 v1(1460,1405)
IO_OE_2: MD1.23 pad.9@1050,1245 | length 537.3
  Top Layer w6: v1(1468.02,1444.41) 1470.59,1444.41 1474.13,1440.87 MD1.23
  Mid Layer 4 w6: v1(1070,1280) 1183.88,1280 1262.43,1358.54 1283.54,1358.54 1341.53,1416.53 1441.53,1416.53 1468.02,1443.02 v1(1468.02,1444.41)
  Bottom Layer w6: pad.9@1050,1245 1055.5,1245 1070,1259.5 v1(1070,1280)
NetC1_1: C1.1 MD1.10 | length 74.7
  Top Layer w6: C1.1 1292.76,1549.57 MD1.10
NetC7_2: C7.2 U1.J10 Y1.3 | length 235.4
  Top Layer w6: U1.J10 1727.28,1122.28 1745,1140 1819.09,1140 1831.94,1127.16 1833.91,1127.16 1846.65,1114.41 1846.65,1064.33 C7.2
NetC8_2: C8.2 U1.H10 Y1.1 | length 181.8
  Top Layer w6: U1.H10 1721.97,1141.97 1747.56,1167.56 Y1.1 1803.35,1217.99 C8.2
NetD1_1: D1.1 R2.1 | length 107.4
  Top Layer w6: R2.1 D1.1
NetD2_1: D2.1 R3.1 | length 107.4
  Top Layer w6: R3.1 D2.1
NetD3_1: D3.1 R4.1 | length 43.5
  Top Layer w10: R4.1 D3.1@1245,1433.19
NetMD1_2: MD1.2 U1.K2 | length 727.9
  Top Layer w6: v1(1340,1676.28) 1340,1679.45 1350.73,1690.18 1350.73,1690.73 1351.3,1691.3 MD1.2 ; v1(1527.95,1082.05) U1.K2
  Mid Layer 3 w6: v1(1340,1676.28) 1420,1596.28 1420,1459.15 1426.88,1452.27 1426.88,1414.28 1527.95,1313.21 v1(1527.95,1082.05)
NetMD1_13: MD1.13 R1.2 | length 79.8
  Top Layer w6: R1.2 1289.06,1496.42 MD1.13
NetMD1_28: MD1.28 U1.K8 | length 450.7
  Top Layer w6: v1(1561.28,1402.72) 1562,1403.43 1562,1423.85 MD1.28 ; v1(1646.06,1081.06) U1.K8
  Mid Layer 3 w6: v1(1561.28,1402.72) 1590,1374 1590,1074.88 1600.04,1064.83 1613.68,1064.83 1628.2,1079.36 1644.36,1079.36 v1(1646.06,1081.06)
NetMD1_33: MD1.33 R2.2 | length 92.8
  Top Layer w6: MD1.33 1644.65,1460.98 R2.2
NetMD1_34: MD1.34 R3.2 | length 81.5
  Top Layer w6: MD1.34 1671.93,1478.7 R3.2
NetMD1_38: MD1.38 U4.13 | length 488
  Top Layer w6: U4.13 1194.24,1577.53 1217.27,1577.53 1229.8,1565 v1(1230,1565) ; MD1.38 1617.83,1549.57 1623.15,1554.88 1626.43,1554.88 1635.36,1563.8 1635.36,1569.62 v1(1637.6,1571.86)
  Mid Layer 4 w6: v1(1230,1565) 1231.86,1566.86 1616.74,1566.86 1619.74,1569.86 1635.6,1569.86 v1(1637.6,1571.86)
NetMD1_39: MD1.39 U4.12 | length 458.5
  Top Layer w6: U4.12 1204.33,1560.16 1211.77,1552.72 1211.9,1552.72 1225,1539.63 v1(1225,1530) ; v1(1595,1550) 1609.38,1564.38 1613.94,1564.38 MD1.39
  Mid Layer 4 w6: v1(1225,1530) 1245,1550 v1(1595,1550)
NetMD1_40: MD1.40 U5.11 | length 109.8
  Top Layer w6: MD1.40 1619.76,1587.91 1624.03,1587.91 1681.12,1645 U5.11
NetMD1_41: MD1.41 U5.9 | length 129.5
  Top Layer w6: MD1.41 1617.83,1602.72 1621.15,1606.03 1624.43,1606.03 1675,1656.6 1675,1675 1684.37,1684.37 U5.9
NetMD1_51: MD1.51 U1.F10 | length 619.7
  Top Layer w6: MD1.51 1547.91,1707.09 1547.91,1696.37 v1(1559.28,1685) ; U1.F10 v1(1708.66,1181.34)
  Mid Layer 3 w6: v1(1559.28,1685) 1559.28,1535.72 1635,1460 1635,1255 v1(1708.66,1181.34)
NetMD1_52: MD1.52 U1.K3 | length 850.5
  Top Layer w6: MD1.52 1530.04,1707.25 1530.04,1687.19 v1(1532.28,1684.95) ; U1.K3 1547.64,1077.89 1560,1065.53 v1(1560,1065)
  Mid Layer 3 w6: v1(1532.28,1684.95) 1532.28,1542.72 1623.22,1451.78 1623.22,1127.75 1662.92,1088.05 1662.92,1072.92 1645,1055 1596.44,1055 1586.44,1065 v1(1560,1065)
NetMD1_53: MD1.53 U1.K6 | length 708.5
  Top Layer w6: v1(1509.57,1685.43) MD1.53 ; U1.K6 1606.78,1102.52 1606.78,1081.94 v1(1606.86,1081.86)
  Mid Layer 3 w6: v1(1509.57,1685.43) 1509.57,1643.41 1493.14,1626.98 1493.14,1613.02 1509.57,1596.59 1509.57,1550.43 1613.72,1446.28 1613.72,1251.34 1606.86,1244.49 v1(1606.86,1081.86)
NetMD1_54: MD1.54 U1.J2 | length 770.7
  Top Layer w6: v1(1485,1685) 1485,1688.17 1490.94,1694.11 1490.94,1709.09 MD1.54 ; v1(1505,1099.33) U1.J2
  Mid Layer 3 w6: v1(1485,1685) 1485,1632.28 1483.64,1630.92 1483.64,1609.08 1484.17,1608.56 1484.17,1449.24 1551.86,1381.55 1551.86,1082.11 1534.94,1065.19 1520.97,1065.19 1505,1081.16 v1(1505,1099.33)
SWD_CLK: J1.3 MD1.26 | length 637.1
  Top Layer w6: v1(1527.28,1382.28) MD1.26
  Top Layer w10: J1.3 1104.76,1072.99 1104.76,1124.76 v1(1110,1130)
  Mid Layer 4 w6: v1(1110,1130) 1358.64,1378.64 1515.7,1378.64 1517.1,1380.04 1525.04,1380.04 v1(1527.28,1382.28)
SWD_IO: J1.4 MD1.25 | length 599.3
  Top Layer w6: J1.4 1095,1163.93 1103.86,1155.07 v1(1103.86,1155) ; v1(1509.04,1395.82) 1509.3,1396.08 1509.3,1424.3 MD1.25
  Mid Layer 4 w6: v1(1103.86,1155) 1120,1155 1353.14,1388.14 1466.98,1388.14 1474.66,1395.82 v1(1509.04,1395.82)
UART_DBG_RX: J1.7 MD1.56 | length 851.4
  Top Layer w6: J1.7 v1(1195,1125) ; v1(1456.42,1686.42) MD1.56
  Mid Layer 3 w6: v1(1195,1125) 1195,1580 1308.14,1693.14 1377.33,1693.14 1384.06,1686.42 v1(1456.42,1686.42)
UART_DBG_TX: J1.6 MD1.1 | length 760.8
  Top Layer w6: J1.6 1145,1153.17 1149.42,1148.75 v1(1149.42,1145.58) ; v1(1340,1710) MD1.1
  Mid Layer 3 w6: v1(1149.42,1145.58) 1175,1171.16 1175,1575 1310,1710 v1(1340,1710)
VBAT: pad.13@1050,1645 U4.16 | length 160.2
  Top Layer w10: U4.16@1180,1643.11 v1(1180,1665)
  Bottom Layer w10: pad.13@1050,1645 1125,1645 1145,1665 v1(1180,1665)
pads on no net: J1.1 J1.2 J1.5 J1.8 MD1.3 MD1.7 MD1.8 MD1.9 MD1.12 MD1.18 MD1.27 MD1.32 MD1.36 MD1.42 MD1.43 MD1.44 MD1.45 MD1.46 MD1.47 MD1.48 MD1.49 MD1.50 MD1.55 MD1.61 MD1.62 MD1.63 MD1.64 MD1.65 MD1.66 MD1.67 MD1.68 MD1.69 MD1.70 MD1.71 MD1.72 MD1.73 MD1.74 MD1.75 MD1.76 MD1.77 MD1.78 MD1.79 MD1.80 MD1.81 MD1.82 MD1.83 MD1.85 U1.K5 U4.6 U4.8 U4.9 U4.10 U4.11 U4.14 U5.2 U5.3

## Polygon pours and split planes (outlines as drawn)
GND on Top Layer "NONET_L01_P-001" (solid, pour order 6): 1000,1720 1605,1720 1605,1870 1920,1870 1920,995 1000,995
1V8 on Top Layer "NONET_L01_P-001" (solid, pour order 1): 1185,1280 1185,1325 1170,1325 1155,1340 1155,1346.81 1168.19,1360 1220,1360 1230,1370 1290,1370 1300,1360 1300,1280 1295,1275 1190,1275
3V3 on Top Layer "NONET_L01_P-001" (solid, pour order 2): 1100,1360 1100,1361.13 1116.16,1377.28 1137.95,1377.28 1137.95,1372.95 1132.05,1367.05 1132.05,1351.69 1140,1343.74 1140,1285 1130,1275 1000,1275 1000,1360
3V3 on Mid Layer 2 "NONET_L01_P-001" (solid, pour order 4): 1000,1720 1660,1720 1660,1875 1920,1875 1920,1000 1000,1000
1V8 on Mid Layer 2 "NONET_L01_P-001" (solid, pour order 3): 1255,1285 1290,1285 1433.03,1141.97 1668.03,1141.97 1740,1070 1800,1070 1815,1085 1815,1240 1812.68,1240 1785,1267.68 1407.32,1267.68 1360,1315 1250,1315 1250,1290
GND on Mid Layer 1 "NONET_L01_P-001" (solid, pour order 5): 1000,1725 1605,1725 1605,1875 1920,1875 1920,1000 1000,1000
GND on Bottom Layer "NONET_L01_P-001" (solid, pour order 7): 1000,1720 1605,1720 1605,1870 1920,1870 1920,995 1000,995

## Silkscreen, mask and mechanical layers (free items; w line width, h text height)
Top Overlay:
  lines w7: 1750,1820 1765,1835 ; 1755,1800 1840,1800 ; 1765,1775 1765,1835 ; 1780,1820 1765,1835 ; 1825,1785 1840,1800 ; 1825,1815 1840,1800
  text "Nixie Clock v2.0" at 1025,1800.5 h45
  text "Controller" at 1070,1755.5 h45
Bottom Overlay:
  text "I2C1_SCL" at 1815,1628.77 h60
  text "VBAT" at 1215.06,1625.17 h60
  text "I2C1_SDA" at 1815,1528.77 h60
  text "GND" at 1198.62,1526.63 h60
  text "GND" at 1815,1430.56 h60
  text "GND" at 1200,1425.56 h60
  text "3V3" at 1200,1330.56 h60
  text "EN3V3" at 1812.2,1328.56 h60
  text "EN170" at 1812.95,1229.4 h60
  text "OE2" at 1200,1225.56 h60
  text "OE1" at 1200.67,1130.72 h60
  text "ALED" at 1815,1130.17 h60
  text "G2" at 1245.56,1115 h60 r270
  text "G1" at 1345.56,1115 h60 r270
  text "G0" at 1445.56,1115 h60 r270